# Altium PCB PCB1.PcbDoc (part 1 of 2)
Units mm, origin at the board's own origin, x right, y up, seen from the top; angles counter-clockwise.
Board outline 153 x 70 mm, 4 copper layers (Top Layer, Middle Layer 1, Middle Layer 2, Bottom Layer), stack 0.417 mm thick; 107 components, 120 nets, 560 pads, 392 vias.
Unrouted connection lines stored in the file: 47.
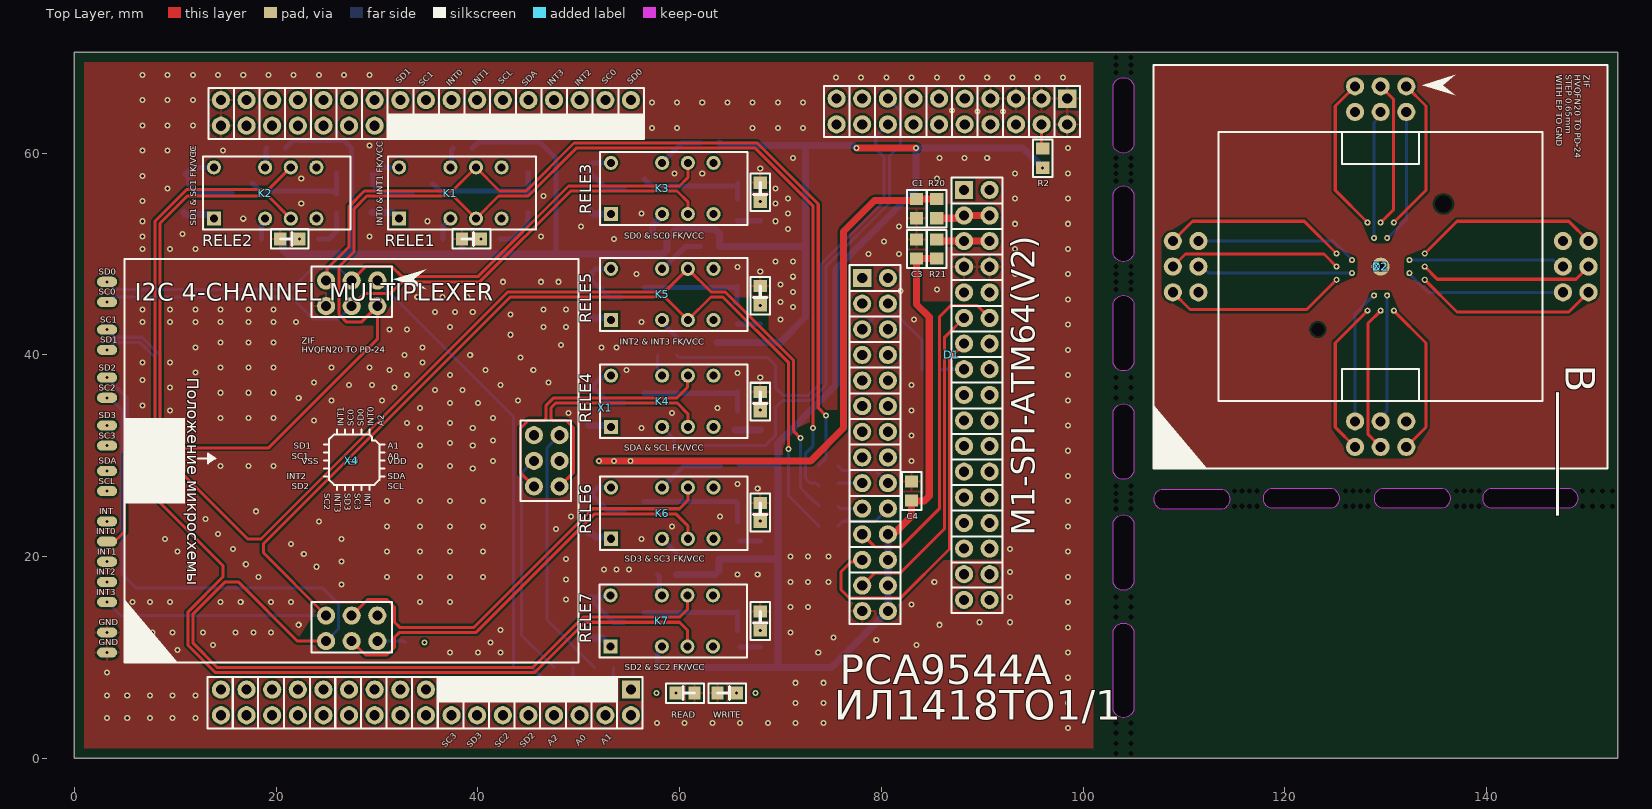
[diagram p0: Top Layer view]
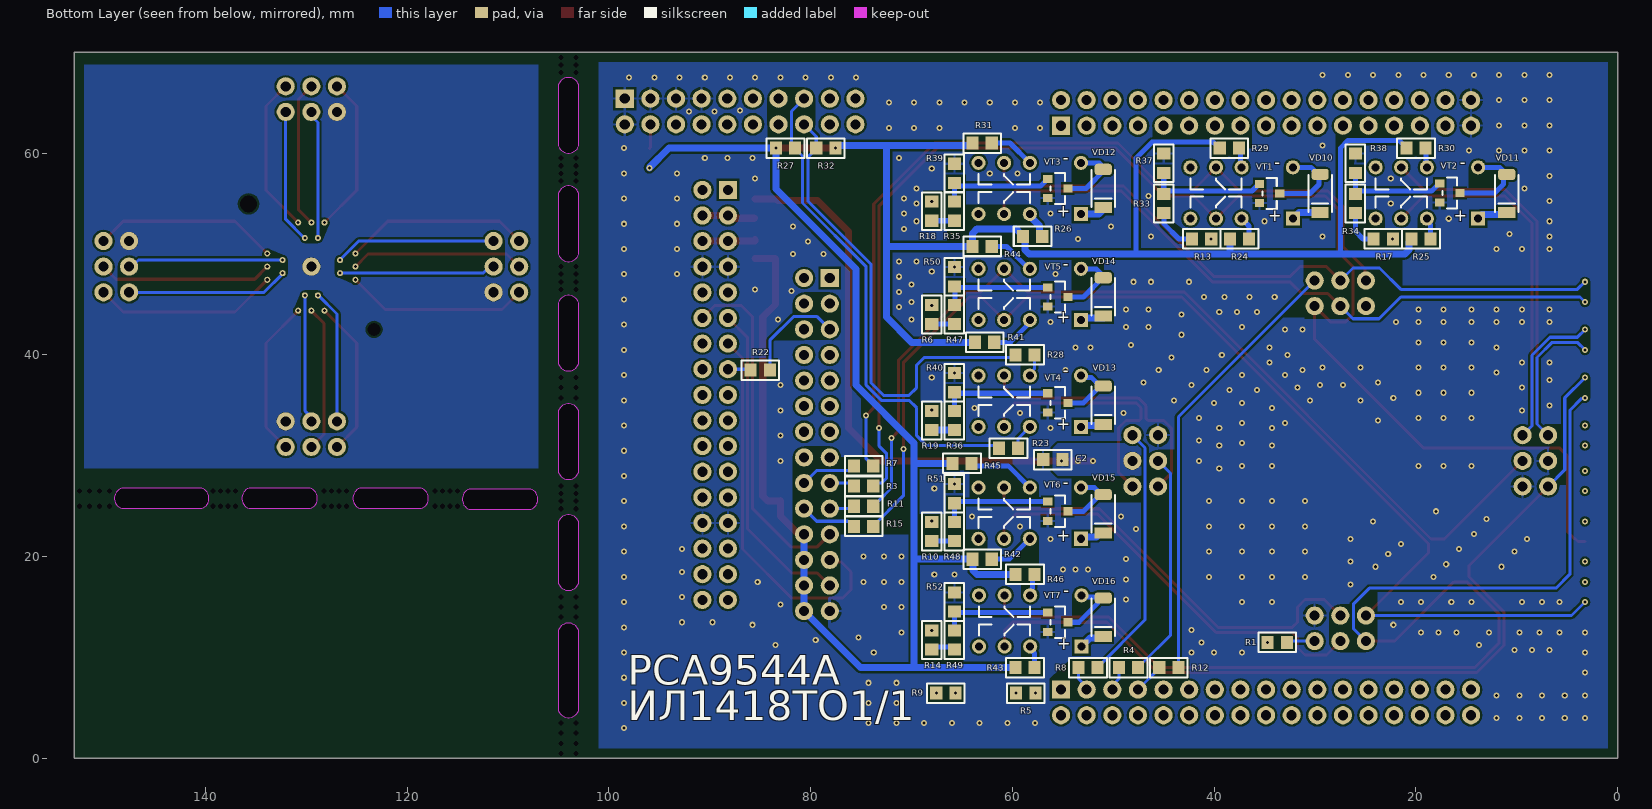
[diagram p1: Bottom Layer view, seen from below]
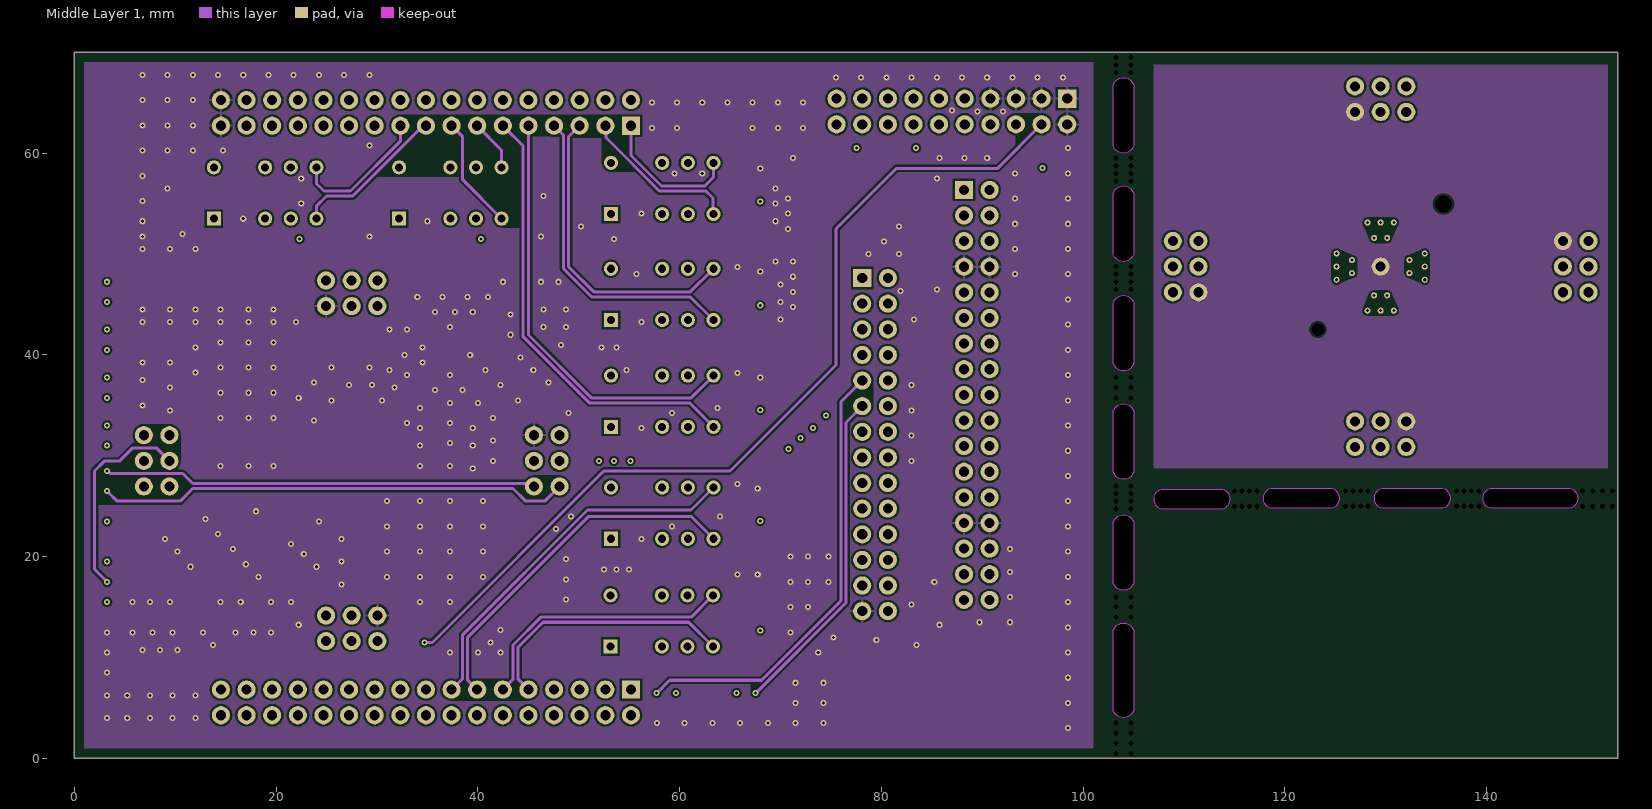
[diagram p2: Middle Layer 1]
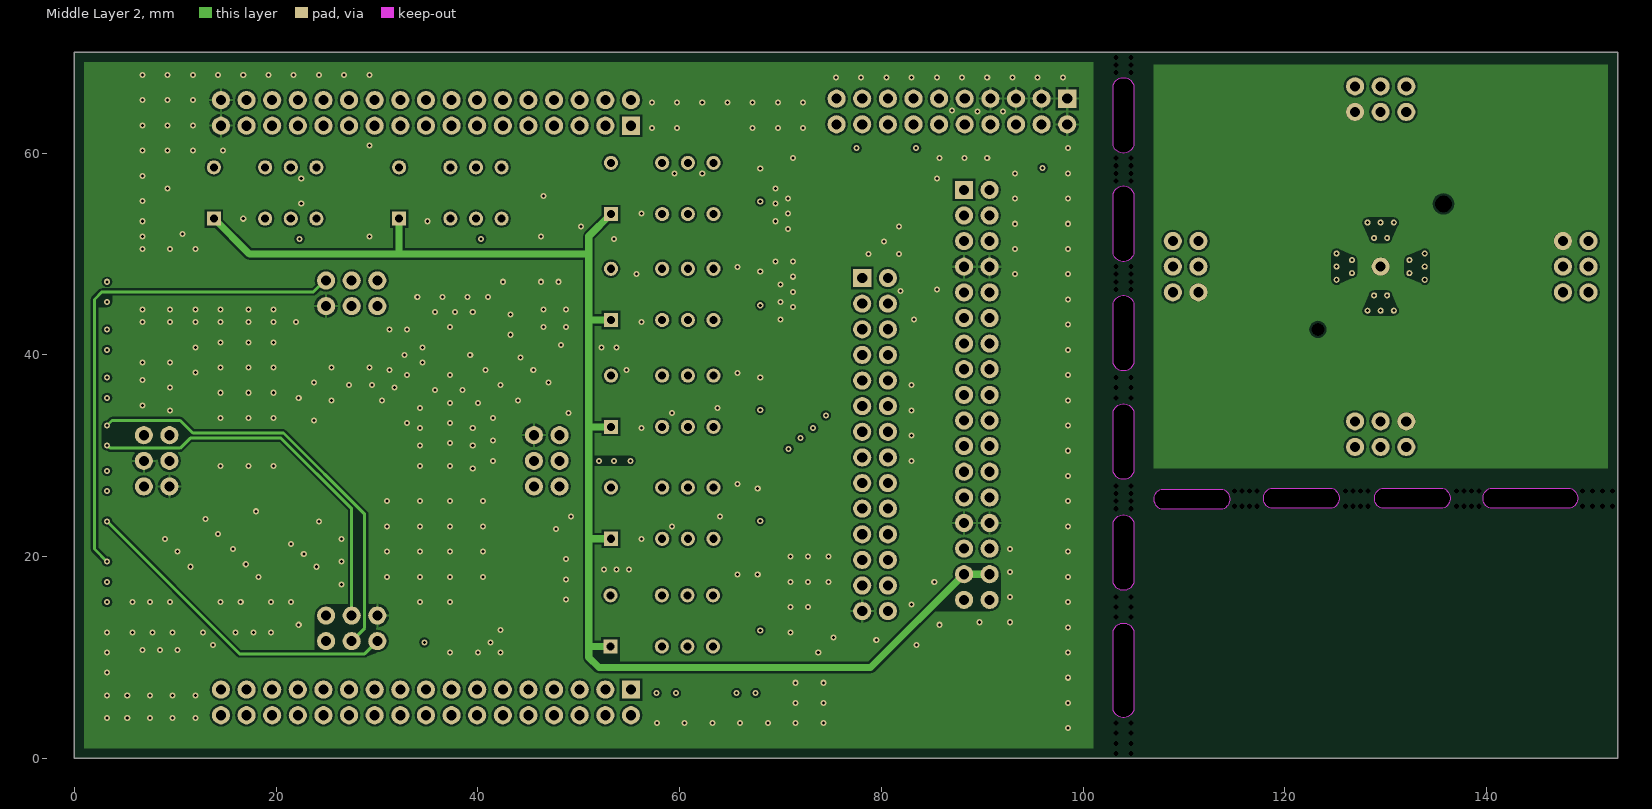
[diagram p3: Middle Layer 2]

## Layer stack, top to bottom
Top Solder: solder mask 0.025, Solder Resist, Dk 4
Top Layer: signal copper 0.018
Dielectric 1: prepreg 0.115, FR4 PR, Dk 4.2
Middle Layer 1: signal copper 0.018
Dielectric 2: prepreg 0.115, FR4 PR, Dk 4.2
Middle Layer 2: signal copper 0.018
Dielectric 3: prepreg 0.115, FR4 PR, Dk 4.2
Bottom Layer: signal copper 0.018
Bottom Solder: solder mask 0.025, Solder Resist, Dk 4

## Board outline
0,0 153,0 153,70 0,70
cut-out: 113.827,26.699 cw(c113.485,25.699) 113.827,24.699 107.757,24.699 cw(c108.099,25.699) 107.757,26.699
cut-out: 124.679,26.783 cw(c124.337,25.783) 124.679,24.783 118.609,24.783 cw(c118.951,25.783) 118.609,26.783
cut-out: 148.303,26.783 cw(c147.961,25.783) 148.303,24.783 140.359,24.783 cw(c140.701,25.783) 140.359,26.783
cut-out: 135.679,26.783 cw(c135.337,25.783) 135.679,24.783 129.609,24.783 cw(c129.951,25.783) 129.609,26.783
cut-out: 105.001,17.374 cw(c104.001,17.716) 103.001,17.374 103.001,23.445 cw(c104.001,23.103) 105.001,23.445
cut-out: 105.001,4.75 cw(c104.001,5.092) 103.001,4.75 103.001,12.695 cw(c104.001,12.353) 105.001,12.695
cut-out: 105.001,39.124 cw(c104.001,39.466) 103.001,39.124 103.001,45.195 cw(c104.001,44.853) 105.001,45.195
cut-out: 105.001,28.374 cw(c104.001,28.716) 103.001,28.374 103.001,34.445 cw(c104.001,34.103) 105.001,34.445
cut-out: 105,49.965 cw(c104,50.307) 103,49.965 103,56.035 cw(c104,55.693) 105,56.035
cut-out: 105,60.715 cw(c104,61.057) 103,60.715 103,66.785 cw(c104,66.443) 105,66.785

## Design rules (kind name [scope] priority, off if disabled: settings)
Clearance [All] p1: gap=0.2 ignorepadtopadclearanceinfootprint=FALSE except(0: Arc-Hole Track-Hole SMDPad-Hole THPad-Hole Via-Hole Fill-Hole Poly-Hole Region-Hole Text-Hole)
ComponentClearance [All] p1: gap=0 collisioncheckmode=3 verticalgap=0 showdistances=FALSE
HoleToHoleClearance [All] p1: gap=0 allowstackedmicrovias=TRUE
PolygonConnect [All vs InNet('GND')] p1: thpad.connectstyle=Relief thpad.reliefconductorwidth=0.254 thpad.reliefentries=4 thpad.polygonreliefangle="90 Angle" thpad.airgapwidth=0.254 smdpad.connectstyle=Relief smdpad.reliefconductorwidth=0.254 smdpad.reliefentries=4 smdpad.polygonreliefangle="90 Angle" smdpad.airgapwidth=0.254 via.connectstyle=Direct via.reliefconductorwidth=0.254 via.reliefentries=4 via.polygonreliefangle="90 Angle" via.airgapwidth=0.254
RoutingVias [All] p1: holewidth=0.3 width=0.6 viastyle="Through Hole" minholewidth=0.3 minwidth=0.6 maxholewidth=0.6 maxwidth=1.2
SilkToSilkClearance [All] p1: silktosilkclearance=0
SilkToSolderMaskClearance [IsPad] p1: minsilkscreentomaskgap=0 clearancetoexposedcopper=TRUE
SolderMaskExpansion [All] p1: expansion=0.102 istentingtop=FALSE
Width [All] p1: maxlimit=0.7 minlimit=0.2 preferedwidth=0.3
26 further rules are at their usual default settings.

## Components (designator, comment, footprint, x,y, rotation, side; value= is the part's Value field where it differs from the comment)
C1 "10uF" 0805 83.5,54.5 r270 top
C2 "0.1uF" 0805 56,29.625 r0 bottom
C3 "10uF" 0805 83.5,50.5 r90 top
C4 "0.1uF" 0805 83,26.5 r90 top
D1 "M1-SPI-ATM64(V2)" M1-SPI-ATM64(V2) 87,40 r270 top locked
D2 "PCA9544ABS" 20LQ65TS15050 129.5,48.75 r0 top
GND "Contact" Contact 3.25,10.5 r180 top (schematic designator KP17)
GND "Contact" Contact 3.25,12.5 r180 top (schematic designator KP16)
INT "Contact" Contact 3.25,23.5 r180 top (schematic designator KP1)
INT0 "Contact" Contact 3.25,21.5 r180 top (schematic designator KP2)
INT1 "Contact" Contact 3.25,19.5 r180 top (schematic designator KP3)
INT2 "Contact" Contact 3.25,17.5 r180 top (schematic designator KP4)
INT3 "Contact" Contact 3.25,15.5 r180 top (schematic designator KP5)
K1 "V23079A1001B301 TE" V23079A1001B301 38.5,56.05 r0 top
K2 "V23079A1001B301 TE" V23079A1001B301 20.14,56.05 r0 top
K3 "V23079A1001B301 TE" V23079A1001B301 59.5,56.5 r0 top
K4 "V23079A1001B301 TE" V23079A1001B301 59.5,35.408 r0 top
K5 "V23079A1001B301 TE" V23079A1001B301 59.5,46 r0 top
K6 "V23079A1001B301 TE" V23079A1001B301 59.5,24.315 r0 top
K7 "V23079A1001B301 TE" V23079A1001B301 59.46,13.63 r0 top
R1 "1" 0805 33.75,11.5 r0 bottom
R2 "10k" 0805 96,59.5 r270 top
R3 "1" 0805 74.75,27 r0 bottom
R4 "1" 0805 48.5,9 r0 bottom
R5 "2.2k" 0805 58.68,6.47 r0 bottom
R6 "2.2k" 0805 68,44 r90 bottom
R7 "1" 0805 74.75,29 r0 bottom
R8 "1" 0805 52.5,9 r0 bottom
R9 "2.2k" 0805 66.6,6.47 r180 bottom
R10 "2.2k" 0805 68,22.5 r90 bottom
R11 "1" 0805 74.75,25 r0 bottom
R12 "1" 0805 44.5,9 r0 bottom
R13 "2.2k" 0805 41.241,51.5 r180 bottom
R14 "2.2k" 0805 68,11.75 r90 bottom
R15 "1" 0805 74.75,23 r0 bottom
R17 "2.2k" 0805 23.241,51.5 r180 bottom
R18 "2.2k" 0805 68,54.25 r90 bottom
R19 "2.2k" 0805 68,33.5 r90 bottom
R20 "1" 0805 85.5,54.5 r90 top
R21 "1" 0805 85.5,50.5 r270 top
R22 "1" 0805 85,38.5 r0 bottom
R23 "100" 0805 60.398,30.75 r0 bottom
R24 "10k" 0805 37.5,51.5 r0 bottom
R25 "10k" 0805 19.5,51.5 r0 bottom
R26 "10k" 0805 58,51.75 r0 bottom
R27 "10k" 0805 82.5,60.5 r0 bottom
R28 "100" 0805 58.75,40 r0 bottom
R29 "10k" 0805 38.5,60.5 r0 bottom
R30 "10k" 0805 20,60.5 r0 bottom
R31 "10k" 0805 63,61 r0 bottom
R32 "10k" 0805 78.5,60.5 r180 bottom
R33 "1k" 0805 45,55 r90 bottom
R34 "1k" 0805 26,55 r90 bottom
R35 "1k" 0805 65.75,54.25 r90 bottom
R36 "1k" 0805 65.75,33.5 r90 bottom
R37 "20k" 0805 45,59 r90 bottom
R38 "20k" 0805 26,59 r90 bottom
R39 "20k" 0805 65.75,58 r90 bottom
R40 "20k" 0805 65.75,37.25 r90 bottom
R41 "10k" 0805 62.75,41.25 r0 bottom
R42 "10k" 0805 63,19.75 r0 bottom
R43 "10k" 0805 58.75,9 r0 bottom
R44 "10k" 0805 63,50.75 r0 bottom
R45 "10k" 0805 65,29.25 r0 bottom
R46 "10k" 0805 58.75,18.25 r0 bottom
R47 "1k" 0805 65.75,44 r90 bottom
R48 "1k" 0805 65.75,22.5 r90 bottom
R49 "1k" 0805 65.75,11.75 r90 bottom
R50 "20k" 0805 65.75,47.75 r90 bottom
R51 "20k" 0805 65.75,26.25 r90 bottom
R52 "20k" 0805 65.75,15.5 r90 bottom
READ "LED(0805)" 0805(LED) 60.55,6.47 r0 top (schematic designator VD1)
RELE1 "LED(0805)" 0805(LED) 39.37,51.5 r180 top (schematic designator VD5)
RELE2 "LED(0805)" 0805(LED) 21.37,51.5 r180 top (schematic designator VD7)
RELE3 "LED(0805)" 0805(LED) 68,56.12 r90 top (schematic designator VD8)
RELE4 "LED(0805)" 0805(LED) 68,35.37 r90 top (schematic designator VD9)
RELE5 "LED(0805)" 0805(LED) 68,45.87 r90 top (schematic designator VD2)
RELE6 "LED(0805)" 0805(LED) 68,24.37 r90 top (schematic designator VD4)
RELE7 "LED(0805)" 0805(LED) 68,13.62 r90 top (schematic designator VD6)
SC0 "Contact" Contact 3.25,45.25 r180 top (schematic designator KP12)
SC1 "Contact" Contact 3.25,42.5 r180 top (schematic designator KP13)
SC2 "Contact" Contact 3.25,35.75 r180 top (schematic designator KP14)
SC3 "Contact" Contact 3.25,31 r180 top (schematic designator KP15)
SCL "Contact" Contact 3.25,26.5 r0 top (schematic designator KP11)
SD0 "Contact" Contact 3.25,47.25 r180 top (schematic designator KP7)
SD1 "Contact" Contact 3.25,40.5 r180 top (schematic designator KP8)
SD2 "Contact" Contact 3.25,37.75 r180 top (schematic designator KP9)
SD3 "Contact" Contact 3.25,33 r180 top (schematic designator KP10)
SDA "Contact" Contact 3.25,28.5 r180 top (schematic designator KP6)
VD10 "LL4148 NXP" SOD80C 29.5,56 r270 bottom
VD11 "LL4148 NXP" SOD80C 11,56 r270 bottom
VD12 "LL4148 NXP" SOD80C 51,56.5 r270 bottom
VD13 "LL4148 NXP" SOD80C 51,35 r270 bottom
VD14 "LL4148 NXP" SOD80C 51,45.75 r270 bottom
VD15 "LL4148 NXP" SOD80C 51,24.25 r270 bottom
VD16 "LL4148 NXP" SOD80C 51,14 r270 bottom
VT1 "MMBT5551L" SOT-23 34.5,56 r270 bottom
VT2 "MMBT5551L" SOT-23 16.64,56.05 r270 bottom
VT3 "MMBT5551L" SOT-23 55.5,56.5 r270 bottom
VT4 "MMBT5551L" SOT-23 55.5,35.25 r270 bottom
VT5 "MMBT5551L" SOT-23 55.5,45.75 r270 bottom
VT6 "MMBT5551L" SOT-23 55.5,24.5 r270 bottom
VT7 "MMBT5551L" SOT-23 55.5,13.5 r270 bottom
WRITE "LED(0805)" 0805(LED) 64.73,6.47 r180 top (schematic designator VD3)
X1 "FORMULA" FORMULA 43,33.5 r0 top locked
X2 "HVQFN20 to DIP-7.62" "HVQFN20 to PD-24" 129.5,48.75 r0 top
X4 "HVQFN20 to DIP-7.62" "HVQFN20 to PD-24" 27.5,29.5 r0 top locked

## Footprints (in the part's own frame and the unit in brackets; to place one, negate y for a bottom-side part, rotate by r counter-clockwise, add the part's x,y. Pads: shape width x height; smd on the part's side, far side on the other; paste and mask are expansions set on the pad)
20LQ65TS15050 [mm]
  round 0 hole 1.27 unplated: 0(-6.225,-6.225)
  round 0 hole 1.68 unplated: 0(6.225,6.225)
  round 0.6 hole 0.3: 1(1.3,4.37) 2(0.65,2.845) 3(0,4.37) 4(-0.65,2.845) 5(-1.3,4.37) 6(-4.37,1.3) 7(-2.845,0.65) 8(-4.37,0) 9(-2.845,-0.65) 10(-4.37,-1.3) 11(-1.3,-4.37) 12(-0.65,-2.845) 13(0,-4.37) 14(0.65,-2.845) 15(1.3,-4.37) 16(4.37,-1.3) 17(2.845,-0.65) 18(4.37,0) 19(2.845,0.65) 20(4.37,1.3)
  round 1.8 hole 1: 21(0,0)
  silkscreen extent -16.06,-13.33 16.06,13.33
0805 [mm]
  rect 1.2x1.3 smd: 1(-0.95,0) 2(0.95,0)
  silkscreen extent -1.87,-0.97 1.87,0.97, body extent -1.05,-0.63 0.95,0.63, height 0.55
0805(LED) [mm]
  rect 1.2x1.3 smd: 1(-0.95,0) 2(0.95,0)
  silkscreen extent -1.87,-0.97 1.87,0.97, body extent -1.03,-0.41 1.03,0.5, height 0.85
Contact [mm]
  oval 2x1 smd: 1(0,0)
FORMULA [mm]
  rect 1.8x1.8 hole 1: 1(12.18,29.22) VDDF(12.18,-26.68) VEEF(45.2,22.86)
  round 1.8 hole 1: 2(9.64,29.22) 3(7.1,29.22) 4(4.56,29.22) 5(2.02,29.22) 6(-0.52,29.22) 7(-3.06,29.22) 8(-5.6,29.22) 9(-8.14,29.22) 10(-10.68,29.22) 11(-13.22,29.22) 12(-15.76,29.22) 13(-18.3,29.22) 14(-20.84,29.22) 15(-23.38,29.22) 16(-25.92,29.22) 17(12.18,31.76) 18(9.64,31.76) 19(7.1,31.76) 20(4.56,31.76) 21(2.02,31.76) 22(-0.52,31.76) 23(-3.06,31.76) 24(-5.6,31.76) 25(-8.14,31.76) 26(-10.68,31.76) 27(-13.22,31.76) 28(-15.76,31.76) 29(-18.3,31.76) 30(-20.84,31.76) 31(-23.38,31.76) 32(-25.92,31.76) 33(-28.46,-29.22) 34(-25.92,-29.22) 35(-23.38,-29.22) 36(-20.84,-29.22) 37(-18.3,-29.22) 38(-15.76,-29.22) 39(-13.22,-29.22) 40(-10.68,-29.22) 41(-8.14,-29.22) 42(-5.6,-29.22) 43(-3.06,-29.22) 44(-0.52,-29.22) 45(2.02,-29.22) 46(4.56,-29.22) 47(7.1,-29.22) 48(9.64,-29.22) 49(-28.46,-26.68) 50(-25.92,-26.68) 51(-23.38,-26.68) 52(-20.84,-26.68) 53(-18.3,-26.68) 54(-15.76,-26.68) 55(-13.22,-26.68) 56(-10.68,-26.68) 57(-8.14,-26.68) 58(-5.6,-26.68) 59(-3.06,-26.68) 60(-0.52,-26.68) 61(2.02,-26.68) 62(4.56,-26.68) 63(7.1,-26.68) 64(9.64,-26.68) +5V(45.2,-15.24) +5V(47.74,-15.24) +5V_VCCF(45.2,20.32) +5V_VCCS(47.74,20.32) +5V_VDDF(45.2,17.78) +5V_VDDS(47.74,17.78) +12V(45.2,-12.7) +12V(47.74,-12.7) -12V(45.2,-17.78) -12V(47.74,-17.78) GND(-28.46,29.22) GND(-28.46,31.76) GND(45.2,-10.16) GND(45.2,15.24) GND(47.74,-10.16) GND(47.74,15.24) IN-OUT1(47.74,10.16) IN-OUT2(47.74,7.62) IN-OUT3(47.74,5.08) IN-OUT4(47.74,2.54) IN-OUT5(47.74,0) IN-OUT6(47.74,-2.54) IN-OUT7(47.74,-5.08) IN-OUT8(47.74,-7.62) NC(45.2,12.7) NC(47.74,12.7) OUT1(45.2,10.16) OUT2(45.2,7.62) OUT3(45.2,5.08) OUT4(45.2,2.54) OUT5(45.2,0) OUT6(45.2,-2.54) OUT7(45.2,-5.08) OUT8(45.2,-7.62) VDDS(12.18,-29.22) VEES(47.74,22.86)
  silkscreen extent -29.8,-30.51 49.02,32.97, body extent -29.79,-30.4 48.98,32.92, height 3
"HVQFN20 to PD-24" [mm]
  round 1.8 hole 1: 1(2.54,17.875) 2(2.54,15.335) 3(0,17.875) 4(0,15.335) 5(-2.54,17.875) 6(-20.605,2.54) 7(-18.065,2.54) 8(-20.605,0) 9(-18.065,0) 10(-20.605,-2.54) 11(-2.54,-17.875) 12(-2.54,-15.335) 13(0,-17.875) 14(0,-15.335) 15(2.54,-17.875) 16(20.605,-2.54) 17(18.065,-2.54) 18(20.605,0) 19(18.065,0) 20(20.605,2.54) 21(-18.065,-2.54) 21(-2.54,15.335) 21(2.54,-15.335) 21(18.065,2.54)
  silkscreen extent -22.5,-20 22.5,20, body extent -22,-19 21.75,19.25, height 2.8
M1-SPI-ATM64(V2) [mm]
  rect 1.8x1.8 hole 1: 1X2(-25.4,11.43) 1X3(-7.62,-8.89)
  round 1.8 hole 1: 2X2(-22.86,11.43) 2X3(-7.62,-6.35) 3X2(-25.4,8.89) 3X3(-5.08,-8.89) 4X2(-22.86,8.89) 4X3(-5.08,-6.35) 5X2(-25.4,6.35) 5X3(-2.54,-8.89) 6X2(-22.86,6.35) 6X3(-2.54,-6.35) 7X2(-25.4,3.81) 7X3(0,-8.89) 8X2(-22.86,3.81) 8X3(0,-6.35) 9X2(-25.4,1.27) 9X3(2.54,-8.89) 10X2(-22.86,1.27) 10X3(2.54,-6.35) 11X2(-25.4,-1.27) 11X3(5.08,-8.89) 12X2(-22.86,-1.27) 12X3(5.08,-6.35) 13X2(-25.4,-3.81) 13X3(7.62,-8.89) 14X2(-22.86,-3.81) 14X3(7.62,-6.35) 15X2(-25.4,-6.35) 15X3(10.16,-8.89) 16X2(-22.86,-6.35) 16X3(10.16,-6.35) 17X2(-25.4,-8.89) 17X3(12.7,-8.89) 18X2(-22.86,-8.89) 18X3(12.7,-6.35) 19X2(-25.4,-11.43) 19X3(15.24,-8.89) 20X2(-22.86,-11.43) 20X3(15.24,-6.35) 21X3(17.78,-8.89) 22X3(17.78,-6.35) 23X3(20.32,-8.89) 24X3(20.32,-6.35) 25X3(22.86,-8.89) 26X3(22.86,-6.35) 27X3(25.4,-8.89) 28X3(25.4,-6.35)
  silkscreen extent -26.67,-12.7 26.67,12.7
SOD80C [mm]
  rrect50% 1.1x1.7 smd: 1(-1.9,0)
  rect 1.1x1.7 smd: 2(1.9,0)
  silkscreen extent -1.85,-1.17 1.85,1.17, body extent -1.9,-0.8 1.8,0.8, height 1.55
SOT-23 [mm]
  rect 0.8x0.9 smd: 1(-0.95,-1) 1(-0.95,-1) 2(0.95,-1) 2(0.95,-1) 3(0,1) 3(0,1)
  silkscreen extent -1.55,-0.72 1.55,0.7, body extent -1.5,-1.25 1.5,1.25, height 1.05
V23079A1001B301 [mm]
  rect 1.4x1.4 hole 0.8: 1(-6.3,-2.54)
  round 1.4 hole 0.8: 3(-1.22,-2.54) 4(1.32,-2.54) 5(3.86,-2.54) 8(3.86,2.54) 9(1.32,2.54) 10(-1.22,2.54) 12(-6.3,2.54)
  silkscreen extent -7.4,-3.63 7.25,3.63, body extent -7.25,-3.6 7.25,3.6, height 10.4

## Part data
C1 C2 C3 C4: library part C0805, ComponentHeigt=1.3, Firme=AVX, KIND=Конденсатор, Leadform=SMD, Packaging=0805
R1 R2 R3 R4 R5 R6 R7 R8 R9 R10 R11 R12 R13 R14 R15 R17 R18 R19 R20 R21 R22 R23 R24 R25 R26 R27 R28 R29 R30 R31 R32 R33 R34 R35 R36 R37 R38 R39 R40 R41 R42 R43 R44 R45 R46 R47 R48 R49 R50 R51 R52: library part "R0805 Yageo", ComponentHeigt=0.6, Firme=Yageo, KIND=Резистор, Leadform=SMD, Packaging=0805
D1: ComponentHeigt=5.5, Name=Вилка, Specification="Вилка PLD2-2 *", Typ=PLD2-2
READ RELE1 RELE2 RELE3 RELE4 RELE5 RELE6 RELE7 WRITE: ComponentHeigt=0.75, Firme=Kingbright, KIND="Светодиод L-1154GD Kingbright", Leadform="в отверстия", NN=24003000
VD10 VD11 VD12 VD13 VD14 VD15 VD16: Component Link=http://www.nxp.com, ComponentHeigt=1.6, Firme=NXP, KIND="Диод LL4148 NXP", Leadform=SMD, NN=24009301, Packaging=SOD-80C
VT1 VT2 VT3 VT4 VT5 VT6 VT7: ComponentHeigt=1.1, Firme=ONS, KIND="Транзистор MMBT5551L*G ONS", Leadform=SMD, NN=24007468, Packaging=SOT-23

## Free pads (board coordinates)
  round 0 hole 0.5 unplated: 38(104.75,2.5) 38(104.75,15) 38(104.75,26.25) 38(104.75,36.75) 38(104.75,48) 38(104.75,58.75) 38(104.75,68) 38(115.75,26.5) 38(126.75,26.5) 38(137.75,26.5) 38(150.5,26.5) 39(104.75,3.5) 39(104.75,16) 39(104.75,27) 39(104.75,37.75) 39(104.75,48.75) 39(104.75,59.5) 39(104.75,68.75) 39(104.75,69.5) 39(115,26.5) 39(126,26.5) 39(137,26.5) 39(149.5,26.5) 41(103.25,1.5) 41(103.25,2.5) 41(103.25,14) 41(103.25,15) 41(103.25,25.5) 41(103.25,26.25) 41(103.25,35.75) 41(103.25,36.75) 41(103.25,47.25) 41(103.25,48) 41(103.25,58) 41(103.25,58.75) 41(103.25,68) 41(115.75,25) 41(116.5,25) 41(126.75,25) 41(127.5,25) 41(137.75,25) 41(138.5,25) 41(150.5,25) 41(151.5,25) 42(103.25,3.5) 42(103.25,16) 42(103.25,27) 42(103.25,37.75) 42(103.25,48.75) 42(103.25,59.5) 42(103.25,68.75) 42(103.25,69.5) 42(115,25) 42(126,25) 42(137,25) 42(149.5,25) 43(103.25,0.5) 43(103.25,24.75) 43(103.25,46.5) 43(103.25,57.25) 43(104.75,0.5) 43(104.75,1.5) 43(104.75,14) 43(104.75,24.75) 43(104.75,25.5) 43(104.75,35.75) 43(104.75,46.5) 43(104.75,47.25) 43(104.75,57.25) 43(104.75,58) 43(116.5,26.5) 43(117.25,25) 43(117.25,26.5) 43(127.5,26.5) 43(128.25,25) 43(128.25,26.5) 43(138.5,26.5) 43(139.25,25) 43(139.25,26.5) 43(151.5,26.5) 43(152.5,25) 43(152.5,26.5)

## Via types
v1: diameter 0.6, hole 0.3, Top Layer to Bottom Layer, tented both sides, 392 vias

## Nets (pads, with @x,y where several pads share a name; then routed paths per layer and width w, separated by ;. In a path a pad name is that pad's centre, name@x,y a point inside that pad or via, vN(x,y) a via of type N, cw(c..) or ccw(c..) an arc to the next point about the centre after c; other vN are vias at no path point)
+5V_CONST: K1.1 K2.1 K3.1 K4.1 K5.1 K6.1 K7.1 VD10.2 VD11.2 VD12.2 VD13.2 VD14.2 VD15.2 VD16.2 X1.+5V | length 158.8
  Middle Layer 2 w0.7: K2.1@13.84,53.51 17.35,50 32.25,50 ; K1.1@32.2,53.51 32.2,50.05 32.25,50 ; K7.1@53.16,11.09 51.09,11.09 51,11 ; K6.1@53.2,21.775 51.025,21.775 51,21.75 ; K4.1@53.2,32.868 51.174,32.868 51,33.042 ; K5.1@53.2,43.46 51.19,43.46 51,43.65 ; K3.1@53.2,53.96 51,51.76 51,50 ; X1.+5V@90.74,18.26 X1.+5V@88.2,18.26 78.94,9 52,9 51,10 51,11 ; 32.25,50 51,50 ; 51,11 51,21.75 ; 51,21.75 51,33.042 ; 51,33.042 51,43.65 ; 51,43.65 51,50
  Bottom Layer w0.7: VD11.2@10.893,54.1 11.093,53.9 13.45,53.9 K2.1@13.84,53.51 ; VD10.2@29.5,54.1 31.61,54.1 K1.1@32.2,53.51 ; VD12.2@50.5,54.6 50.8,54.6 51.44,53.96 K3.1@53.2,53.96 ; VD14.2@50.75,43.85 50.95,43.65 52.733,43.65 K5.1@52.95,43.433 ; VD16.2@51,12.1 51.167,11.933 52.317,11.933 K7.1@53.16,11.09 ; VD15.2@51,22.35 51.3,22.35 51.68,21.97 53.005,21.97 K6.1@53.2,21.775 ; VD13.2@51,33.1 51.116,32.984 53.084,32.984 K4.1@53.2,32.868
+5V_VCC: R20.1 X1.+5V_VCCF X1.+5V_VCCS | length 5.3
  Top Layer w0.7: R20.1@85.55,53.55 87.632,53.55 87.902,53.82 X1.+5V_VCCS@90.74,53.82
+5V_VDD: R21.1 X1.+5V_VDDF X1.+5V_VDDS | length 5.4
  Top Layer w0.7: R21.1@85.5,51.45 85.5,51.28 X1.+5V_VDDF@88.2,51.28 X1.+5V_VDDS@90.74,51.28
A0_F: R4.2 X1.63 | length 2.4
  Bottom Layer w0.3: R4.2@49.45,9 49.45,7.876 50.1,7.226 X1.63@50.1,6.82
A0_KY: D2.19 X2.19 | length 15.5
  Bottom Layer w0.3: D2.19@132.345,49.4 146.639,49.4 147.289,48.75 X2.19@147.565,48.75
A0_PCA: R4.1 X4.19 | length 22.4
  Bottom Layer w0.3: X4.19@45.565,29.5 44.315,28.25 44.315,12.235 47.05,9.5 47.1,9.5 47.55,9.05 R4.1@47.55,9
A1_F: R8.2 X1.64 | length 2.5
  Bottom Layer w0.3: X1.64@52.64,6.82 52.64,7.09 53.45,7.9 R8.2@53.45,9
A1_KY: D2.20 X2.20 | length 18.4
  Top Layer w0.3: D2.20@133.87,50.05 137.07,53.25 148.145,53.25 X2.20@150.105,51.29
A1_PCA: R8.1 X4.20 | length 25.5
  Bottom Layer w0.3: X4.20@48.105,32.04 46.855,30.79 46.855,13.745 51.55,9.05 R8.1@51.55,9
A2_F: R12.2 X1.62 | length 3.1
  Bottom Layer w0.3: R12.2@45.45,9 45.45,8.95 47.56,6.84 X1.62@47.56,6.82
A2_KY: D2.1 X2.1 | length 15.6
  Top Layer w0.3: D2.1@130.8,53.12 134,56.32 134,64.665 X2.1@132.04,66.625
A2_PCA: R12.1 X4.1 | length 44
  Bottom Layer w0.3: X4.1@30.04,47.375 43.55,33.865 R12.1@43.55,9
DI1_MC: D1.21X3 X1.IN-OUT1 | length 34.7
  Top Layer w0.3: D1.21X3@78.11,22.22 79.36,20.97 81.97,20.97 85.75,24.75 85.75,43.75 86.91,44.91 89.49,44.91 X1.IN-OUT1@90.74,43.66
DO1_MC: D1.25X3 X1.OUT1 | length 32.2
  Top Layer w0.3: D1.25X3@78.11,17.14 79.36,18.39 81.89,18.39 86.25,22.75 86.25,41.71 X1.OUT1@88.2,43.66
DO2_MC: D1.23X3 X1.OUT2 | length 38.5
  Top Layer w0.3: D1.23X3@78.11,19.68 77.92,19.49 76.99,19.49 76,18.5 76,16.73 76.84,15.89 81.89,15.89 86.75,20.75 86.75,39.67 X1.OUT2@88.2,41.12
EP_KY: D2.21 X2.21
GND: C1.2 C2.2 C3.2 C4.2 D1.1X2 D1.2X2 D1.3X2 D1.5X2 D1.7X2 D1.27X3 GND.1 R37.2 R38.2 R39.2 R40.2 R50.2 R51.2 R52.2 READ.2 RELE1.2 RELE2.2 RELE3.2 RELE4.2 RELE5.2 RELE6.2 RELE7.2 VT1.2 VT2.2 VT3.2 VT4.2 VT5.2 VT6.2 VT7.2 WRITE.2 X1.GND X4.8 X4.21
  other v1: 98.5,3 57.75,3.5 60.5,3.5 63.25,3.5 66,3.5 68.75,3.5 71.5,3.5 74.25,3.5 3.25,4 5.25,4 7.5,4 9.75,4 12,4 71.5,5.5 74.25,5.5 98.5,5.5 3.25,6.25 5.25,6.25 7.5,6.25 9.75,6.25 12,6.25 71.5,7.5 74.25,7.5 98.5,8 3.25,8.5 3.25,10.5 37.25,10.5 40,10.5 42.25,10.5 73.75,10.5 98.5,10.5 6.75,10.75 8.5,10.75 10.25,10.75 13.75,11.25 83.5,11.25 41.25,11.5 79.5,11.75 75.25,12 3.25,12.5 5.75,12.5 7.75,12.5 9.75,12.5 12.75,12.5 16,12.5 17.75,12.5 19.5,12.5 71,12.5 42.25,12.75 98.5,13 22.25,13.25 85.75,13.25 89.75,13.5 92.75,13.5 71,15 72.75,15 83,15.25 5.75,15.5 7.5,15.5 9.5,15.5 14.5,15.5 16.5,15.5 19.5,15.5 21.5,15.5 34.25,15.5 37.25,15.5 98.5,15.5 48.75,15.75 92.75,16 26.5,17.25 71,17.5 72.75,17.5 74.75,17.5 85.25,17.5 48.75,17.75 18.25,18 31,18 34.25,18 37.25,18 40.5,18 98.5,18 65.75,18.25 67.75,18.25 92.75,18.5 52.5,18.75 53.75,18.75 55,18.75 11.5,19 24,19 17,19.25 26.5,19.5 48.75,19.75 71,20 72.75,20 74.75,20 22.75,20.25 10.25,20.5 31,20.5 34.25,20.5 37.25,20.5 40.5,20.5 98.5,20.5 15.75,20.75 92.75,20.75 21.5,21.25 9,21.75 26.5,21.75 56.25,21.75 14.25,22.25 47.75,22.75 31,23 34.25,23 37.25,23 40.5,23 59.25,23 98.5,23 24.25,23.5 13,23.75 49.25,24 64,24 18,24.5 31,25.5 34.25,25.5 37.25,25.5 40.5,25.5 98.5,25.5 67.75,26.75 65.75,27.2 98.5,28 39.5,28.75 14.5,29 17.25,29 19.75,29 34.25,29 37.25,29 41.5,29.5 83,29.5 98.5,30.5 34.25,31 39.5,31 37.25,31.25 41.5,31.5 83,32 34.25,32.75 39.5,32.75 56.25,32.75 98.5,33 33,33.25 37.25,33.25 23.75,33.5 14.5,33.75 17.25,33.75 19.75,33.75 41.5,33.75 49,34.25 59.25,34.25 9.5,34.5 83,34.5 34.25,34.75 63.75,34.75 6.75,35 37.25,35.25 40,35.25 25.5,35.5 30.5,35.5 44,35.5 98.5,35.5 22.25,35.75 14.5,36.25 17.25,36.25 19.75,36.25 35.75,36.5 38.5,36.5 9.5,36.75 31.75,36.75 27.25,37 29.5,37 42.25,37 83,37 23.75,37.25 47,37.25 6.75,37.5 68,37.75 33,38 37.25,38 98.5,38 65.75,38.2 12,38.25 31.25,38.5 40.75,38.5 45.5,38.5 54.75,38.5 14.5,38.75 17.25,38.75 19.75,38.75 25.5,38.75 29.25,38.75 6.75,39.25 9.5,39.25 34.5,39.25 44.25,39.75 32.75,40 39.25,40 98.5,40.5 12,40.75 34.5,40.75 52.25,40.75 53.75,40.75 48.25,41 14.5,41.25 17.25,41.25 19.75,41.25 43.25,42 31.25,42.5 33,42.5 37.25,42.75 46.5,42.75 48.75,42.75 98.5,43 6.75,43.25 9.5,43.25 12,43.25 14.5,43.25 17.25,43.25 19.75,43.25 22,43.25 56.25,43.25 70,43.5 83.25,43.5 43.25,44 35.75,44.25 37.75,44.25 39.5,44.25 6.75,44.5 9.5,44.5 12,44.5 14.5,44.5 17.25,44.5 19.75,44.5 46.5,44.5 48.75,44.5 71.25,44.75 70,45.25 98.5,45.5 34,45.75 36.5,45.75 39,45.75 41,45.75 71.25,46.25 81.92,46.35 85.5,46.5 70,47 42.5,47.25 46.25,47.25 48,47.25 71.25,47.75 55.75,48 93.25,48 98.5,48 68,48.25 65.75,48.7 69.5,49.25 71.25,49.25 78.75,50 81.75,50 6.75,50.5 9.5,50.5 12,50.5 93.25,50.5 98.5,50.5 80.25,51.25 53.5,51.5 6.75,51.75 29.25,51.75 46.25,51.75 10.75,52 70.75,52.5 50.25,52.75 81.75,52.75 93.25,53 98.5,53 6.75,53.25 35,53.25 69.5,53.25 16.75,53.5 56.25,54 70.75,54 22.5,55 69.5,55 6.75,55.25 70.75,55.5 93.25,55.5 98.5,55.5 46.5,55.75 9.25,56.5 69.5,56.5 22.5,57.5 85.5,57.5 6.75,57.75 59.5,58 62.25,58 93.25,58 98.5,58 68,58.5 71.25,59.5 85.75,59.5 88.25,59.5 90.5,59.5 6.75,60.25 9.25,60.25 11.75,60.25 14.75,60.25 98.5,60.5 29.25,60.75 57.25,62.5 59.75,62.5 67.25,62.5 69.75,62.5 72.25,62.5 6.75,62.75 9.25,62.75 11.75,62.75 89.54,64.13 92.08,64.13 86.999,64.233 57.25,65 59.75,65 62.25,65 64.75,65 67.25,65 69.75,65 72.25,65 6.75,65.25 9.25,65.25 11.75,65.25 75.5,67.5 78,67.5 80.5,67.5 83,67.5 85.5,67.5 88,67.5 88,67.5 90.5,67.5 93,67.5 95.5,67.5 98,67.5 6.75,67.75 9.25,67.75 11.75,67.75 14.25,67.75 16.75,67.75 19.25,67.75 21.75,67.75 24.25,67.75 26.75,67.75 29.25,67.75
GND_KY: D2.8 X2.8 | length 17.3
  Top Layer w0.3: X2.8@108.895,48.75 110.145,50 123.88,50 D2.8@125.13,48.75
INT0_F: K1.5 X1.8 | length 11.3
  Middle Layer 1 w0.3: X1.8@37.4,62.72 38.5,61.62 38.5,57.37 K1.5@42.36,53.51
INT0_KY: D2.2 X2.2 | length 13.3
  Bottom Layer w0.3: D2.2@130.15,51.595 130.194,51.595 132.04,53.441 X2.2@132.04,64.085
INT0_MC: D1.17X3 R3.2 | length 2.4
  Bottom Layer w0.3: R3.2@75.7,27.25 75.75,27.3 D1.17X3@78.11,27.3
INT0_PCA: INT0.1 K1.4 R3.1 X4.2 | length 139.8
  Top Layer w0.3: INT0.1@3.25,21.5 3.939,21.5 4.182,21.743 4.251,21.743 5,22.492 5,30 5.79,30.79 19.29,30.79 30.04,41.54 X4.2@30.04,44.835 28.455,43.25 27,43.25 26.25,44 26.25,48.75 27.75,50.25 27.75,54.5 29,55.75 37.58,55.75 K1.4@39.82,53.51 42.06,55.75 45,55.75 49.75,60.5 67.5,60.5 73.25,54.75 v1(73.25,32.75)
  Bottom Layer w0.3: v1(73.25,32.75) 73.25,31.005 72.5,30.255 72.5,27.75 72.926,27.324 73.476,27.324 R3.1@73.8,27
INT1_F: K1.8 X1.7 | length 5.1
  Middle Layer 1 w0.3: X1.7@39.94,62.72 42.36,60.3 K1.8@42.36,58.59
INT1_KY: D2.5 X2.5 | length 15.6
  Top Layer w0.3: X2.5@126.96,66.625 125,64.665 125,56.32 D2.5@128.2,53.12
INT1_MC: D1.18X3 R7.2 | length 5.7
  Bottom Layer w0.3: R7.2@75.7,29 76.15,28.55 79.4,28.55 D1.18X3@80.65,27.3
INT1_PCA: INT1.1 K1.9 R7.1 X4.5 | length 138.7
  Top Layer w0.3: X4.5@24.96,47.375 25.049,47.464 25.049,48.549 27.25,50.75 27.25,54.75 28.75,56.25 37.48,56.25 K1.9@39.82,58.59 42.16,56.25 44.793,56.25 49.543,61 67.707,61 73.75,54.957 73.75,34.75 v1(74.5,34)
  Middle Layer 2 w0.3: v1(3.25,19.5) 2,20.75 2,45.5 2.75,46.25 23.724,46.25 24.849,47.375 X4.5@24.96,47.375
  Bottom Layer w0.3: R7.1@73.8,29 73.8,29.05 74.25,29.5 74.3,29.5 74.5,29.7 v1(74.5,34)
INT2_F: K5.8 X1.3 | length 30.8
  Middle Layer 1 w0.3: X1.3@50.1,62.72 49,61.62 49,48.75 51.5,46.25 61.07,46.25 K5.8@63.36,48.54
INT2_KY: D2.9 X2.9 | length 15.5
  Bottom Layer w0.3: X2.9@111.435,48.75 111.841,48.75 112.491,48.1 D2.9@126.655,48.1
INT2_MC: D1.19X3 R11.2 | length 2.5
  Bottom Layer w0.3: R11.2@75.7,25 75.94,24.76 D1.19X3@78.11,24.76
INT2_PCA: INT2.1 K5.9 R11.1 X4.9 | length 115.9
  Top Layer w0.3: X4.9@9.435,29.5 17.185,21.75 18.5,21.75 43,46.25 58.53,46.25 K5.9@60.82,48.54 63.11,46.25 64.5,46.25 71.313,39.437 71.313,32.437 v1(72,31.75)
  Middle Layer 1 w0.3: v1(3.25,17.5) 2,18.75 2,28.5 2.96,29.46 4.46,29.46 5.75,30.75 8.185,30.75 X4.9@9.435,29.5
  Bottom Layer w0.3: v1(72,31.75) 72,26.8 73.3,25.5 73.35,25.5 73.8,25.05 R11.1@73.8,25
INT3_F: K5.5 X1.4 | length 31.5
  Middle Layer 1 w0.3: X1.4@47.56,62.72 48.5,61.78 48.5,48.543 51.293,45.75 61.07,45.75 K5.5@63.36,43.46
INT3_KY: D2.12 X2.12 | length 13.3
  Bottom Layer w0.3: X2.12@126.96,33.415 126.96,44.059 128.806,45.905 D2.12@128.85,45.905
INT3_MC: D1.20X3 R15.2 | length 5.7
  Bottom Layer w0.3: R15.2@75.7,23 75.7,23.05 76.15,23.5 76.316,23.5 76.326,23.51 79.4,23.51 D1.20X3@80.65,24.76
INT3_PCA: INT3.1 K5.4 R15.1 X4.12 | length 116.2
  Top Layer w0.3: X4.12@24.96,14.165 18.75,20.375 18.75,21.293 43.207,45.75 58.53,45.75 K5.4@60.82,43.46 63.11,45.75 64.293,45.75 70.813,39.23 v1(70.813,30.687)
  Bottom Layer w0.3: v1(3.25,15.5) 4.585,14.165 X4.12@24.96,14.165 ; v1(70.813,30.687) 70.813,26.037 73.8,23.05 R15.1@73.8,23
INT_KY: D2.15 X2.15 | length 15.6
  Top Layer w0.3: D2.15@130.8,44.38 134,41.18 134,32.835 X2.15@132.04,30.875
INT_MC: D1.4X2 R1.2 R2.1 | length 92.8
  Top Layer w0.3: D1.4X2@95.89,62.86 95.89,60.56 R2.1@96,60.45
  Middle Layer 1 w0.3: v1(34.7,11.5) 35.5,11.5 52.5,28.5 65,28.5 75.5,39 75.5,52.5 81.5,58.5 91.53,58.5 D1.4X2@95.89,62.86
INT_PCA: INT.1 R1.1 X4.15 | length 35.6
  Middle Layer 2 w0.3: v1(3.25,23.5) 16.375,10.375 28.79,10.375 X4.15@30.04,11.625
  Bottom Layer w0.3: X4.15@30.04,11.625 32.675,11.625 R1.1@32.8,11.5
NetK1_3: K1.3 R24.1 | length 2.3
  Bottom Layer w0.5: R24.1@36.55,51.5 36.55,52.78 K1.3@37.28,53.51
NetK1_10: K1.10 R29.1 | length 2
  Bottom Layer w0.5: K1.10@37.28,58.59 37.415,58.725 37.415,60.365 R29.1@37.55,60.5
NetK1_12: K1.12 VD10.1 VT1.3 | length 8.3
  Bottom Layer w0.5: K1.12@32.2,58.59 30.393,58.59 30.085,58.282 30.085,58.198 29.786,57.9 VD10.1@29.5,57.9 29.607,57.793 29.607,56.893 30.5,56 VT1.3@33.5,56
NetK2_3: K2.3 R25.1 | length 2.2
  Bottom Layer w0.5: R25.1@18.55,51.5 18.55,52.896 18.92,53.266 K2.3@18.92,53.51
NetK2_10: K2.10 R30.1 | length 2
  Bottom Layer w0.5: K2.10@18.92,58.59 18.985,58.655 18.985,60.435 R30.1@19.05,60.5
NetK2_12: K2.12 VD11.1 VT2.3 | length 8.9
  Bottom Layer w0.5: K2.12@13.84,58.59 11.69,58.59 11.4,58.3 11.229,58.129 VD11.1@11,57.9 11.027,57.9 11.325,57.602 11.325,56.925 12.2,56.05 VT2.3@15.64,56.05
NetK3_3: K3.3 R26.1 | length 2.7
  Bottom Layer w0.7: R26.1@57.05,51.75 57.3,52 57.3,52.791 58.28,53.771 K3.3@58.28,53.96
NetK3_10: K3.10 R31.1 | length 4.6
  Bottom Layer w0.5: K3.10@58.28,59.04 60.24,61 R31.1@62.05,61
NetK3_12: K3.12 VD12.1 VT3.3 | length 7.5
  Bottom Layer w0.5: VD12.1@50.5,58.4 VD12.1@50.786,58.4 ; K3.12@53.2,59.04 51.393,59.04 51.085,58.732 51.085,58.698 VD12.1@50.786,58.4 ; VT3.3@54.5,56.5 52.7,56.5 50.8,58.4 VD12.1@50.786,58.4
NetK4_3: K4.3 R23.1 | length 2.6
  Bottom Layer w0.3: K4.3@58.28,32.868 59.448,31.7 R23.1@59.448,30.75
NetK4_10: K4.10 R28.1 | length 2.3
  Bottom Layer w0.3: R28.1@57.8,40 57.8,38.656 58.28,38.176 K4.10@58.28,37.948
NetK4_12: K4.12 VD13.1 VT4.3 | length 6.5
  Bottom Layer w0.5: VD13.1@51,36.9 VD13.1@51.3,36.9 ; K4.12@53.2,37.948 53.028,37.775 52.189,37.775 51.314,36.9 VD13.1@51.3,36.9 ; VT4.3@54.5,35.25 52.95,35.25 VD13.1@51.3,36.9
NetK5_3: K5.3 R41.1 | length 5
  Bottom Layer w0.5: K5.3@58.03,43.433 60.213,41.25 61.45,41.25 61.665,41.465 61.665,41.635 R41.1@61.8,41.5
NetK5_10: K5.10 R44.1 | length 4.7
  Bottom Layer w0.5: K5.10@58.28,48.54 58.376,48.54 60.586,50.75 R44.1@62.05,50.75
NetK5_12: K5.12 VD14.1 VT5.3 | length 6.7
  Bottom Layer w0.5: VD14.1@50.75,47.65 VD14.1@51.036,47.65 ; K5.12@52.95,48.513 51.685,48.513 51.335,48.162 51.335,47.948 VD14.1@51.036,47.65 ; VT5.3@54.25,45.75 52.95,45.75 51.05,47.65 VD14.1@51.036,47.65
NetK6_3: K6.3 R42.1 | length 4.6
  Bottom Layer w0.5: K6.3@58.28,21.775 60.305,19.75 R42.1@62.05,19.75
NetK6_10: K6.10 R45.1 | length 6.7
  Bottom Layer w0.5: K6.10@58.28,26.855 60.425,29 R45.1@64.05,29
NetK6_12: K6.12 VD15.1 VT6.3 | length 6.5
  Bottom Layer w0.5: VD15.1@51,26.15 51.3,26.15 52.95,24.5 VT6.3@54.5,24.5 ; VD15.1@51.15,26.3 51.436,26.3 51.585,26.448 51.585,26.547 51.893,26.855 K6.12@53.2,26.855
NetK7_3: K7.3 R43.1 | length 2.3
  Bottom Layer w0.5: R43.1@57.8,9 57.8,10.406 58.24,10.846 K7.3@58.24,11.09
NetK7_10: K7.10 R46.1 | length 2.3
  Bottom Layer w0.5: R46.1@57.8,18.25 58.02,18.03 58.02,16.913 58.068,16.865 58.068,16.342 K7.10@58.24,16.17
NetK7_12: K7.12 VD16.1 VT7.3 | length 6.8
  Bottom Layer w0.5: VD16.1@51,15.9 51.286,15.9 51.585,15.602 51.585,15.342 53.427,13.5 VT7.3@54.5,13.5 ; VD16.1@51.098,15.998 52.988,15.998 K7.12@53.16,16.17
NetR5_2: R5.2 READ.1
  other v1: 59.63,6.47
NetR6_2: R6.2 RELE5.1
  other v1: 68,44.92
NetR9_2: R9.2 WRITE.1
  other v1: 65.65,6.47
NetR10_2: R10.2 RELE6.1
  other v1: 68,23.55
NetR13_2: R13.2 RELE1.1
  other v1: 40.32,51.5
NetR14_2: R14.2 RELE7.1
  other v1: 68,12.7
NetR17_2: R17.2 RELE2.1
  other v1: 22.32,51.5
NetR18_2: R18.2 RELE3.1
  other v1: 68,55.2
NetR19_2: R19.2 RELE4.1
  other v1: 68,34.55
NetR33_2: R33.2 R37.1 VT1.1 | length 12
  Bottom Layer w0.5: VT1.1@35.5,56.95 35.55,56.95 36.25,56.25 44.7,56.25 R33.2@45,55.95 R37.1@45,58.05
NetR34_2: R34.2 R38.1 VT2.1 | length 10.9
  Bottom Layer w0.5: VT2.1@17.64,57 17.69,57 18.44,56.25 25.7,56.25 R34.2@26,55.95 R38.1@26,58.05
NetR35_2: R35.2 R39.1 VT3.1 | length 10.7
  Bottom Layer w0.5: VT3.1@56.5,57.45 56.55,57.45 56.7,57.3 56.7,57.25 57.2,56.75 R39.1@65.319,56.75 ; R35.2@65.75,55.45 R39.1@65.75,57.05
NetR36_2: R36.2 R40.1 VT4.1 | length 11.1
  Bottom Layer w0.5: VT4.1@56.5,36.2 65.65,36.2 R40.1@65.75,36.3 R36.2@65.75,34.45
NetR47_2: R47.2 R50.1 VT5.1 | length 11.2
  Bottom Layer w0.5: VT5.1@56.5,46.7 65.65,46.7 R50.1@65.7,46.75 ; R47.2@65.5,45.2 R47.2@65.7,45.4 ; R47.2@65.7,45.15 R47.2@65.7,45.4 ; R50.1@65.75,46.8 R50.1@65.7,46.75 ; R47.2@65.7,45.4 R50.1@65.7,46.75
NetR48_2: R48.2 R51.1 VT6.1 | length 11.2
  Bottom Layer w0.5: VT6.1@56.5,25.45 65.6,25.45 R51.1@65.75,25.3 R48.2@65.75,23.45
NetR49_2: R49.2 R52.1 VT7.1 | length 11.1
  Bottom Layer w0.5: VT7.1@56.5,14.45 65.65,14.45 R52.1@65.75,14.55 R49.2@65.75,12.7
READ: D1.9X3 R5.1 | length 44.8
  Middle Layer 1 w0.3: v1(57.73,6.47) 59.01,7.75 68.123,7.75 76,15.627 76,35.35 D1.9X3@78.11,37.46
RELE1: R13.1 R33.1 | length 4.5
  Bottom Layer w0.5: R13.1@42.191,51.5 43.5,51.5 44.993,52.993 44.993,54.043 R33.1@45,54.05
RELE2: R17.1 R34.1 | length 3.9
  Bottom Layer w0.5: R17.1@24.191,51.5 25.25,51.5 26,52.25 R34.1@26,54.05
RELE3: R18.1 R35.1 | length 2.3
  Bottom Layer w0.5: R35.1@65.75,53.3 R18.1@68,53.3 R18.1@68.025,53.275
RELE4: R19.1 R36.1 | length 2.5
  Bottom Layer w0.7: R36.1@65.5,32.55 R19.1@68,32.55
RELE5: R6.1 R47.1 | length 2.3
  Bottom Layer w0.5: R47.1@65.75,43.05 R6.1@68,43.05
RELE6: R10.1 R48.1 | length 2
  Bottom Layer w0.5: R48.1@66,21.55 R10.1@68,21.55
RELE7: R14.1 R49.1 | length 2
  Bottom Layer w0.5: R49.1@66,11.05 R14.1@68,11.05
RST_IN: R22.2 X1.OUT3 | length 2.3
  Bottom Layer w0.3: R22.2@85.95,38.5 86.03,38.58 X1.OUT3@88.2,38.58
RST_MC: D1.5X3 R22.1 | length 10.4
  Bottom Layer w0.3: D1.5X3@78.11,42.54 79.36,43.79 81.71,43.79 84.05,41.45 R22.1@84.05,38.5
SC0_F: K3.5 X1.2 | length 15.9
  Middle Layer 1 w0.3: X1.2@52.64,62.72 52.704,62.656 52.704,61.546 58,56.25 62.61,56.25 63.316,55.544 63.316,54.004 K3.5@63.36,53.96
SC0_KY: D2.4 X2.4 | length 12.8
  Bottom Layer w0.3: D2.4@128.85,51.595 128.85,63.029 129.5,63.679 X2.4@129.5,64.085
SC0_PCA: K3.4 SC0.1 X4.4 | length 65.6
  Top Layer w0.3: X4.4@27.5,44.835 28.75,46.085 31.335,46.085 32.5,47.25 40,47.25 40.207,47.25 49.207,56.25 59.75,56.25 60.82,55.18 K3.4@60.82,53.96
  Bottom Layer w0.3: v1(3.25,45.25) 3.75,45.75 21.5,45.75 23.665,43.585 26.25,43.585 X4.4@27.5,44.835
SC1_F: K2.5 X1.9 | length 15.4
  Middle Layer 1 w0.3: K2.5@24,53.51 24,54.75 25,55.75 27.595,55.75 34.565,62.72 X1.9@34.86,62.72
SC1_KY: D2.7 X2.7 | length 16
  Bottom Layer w0.3: X2.7@111.435,51.29 124.809,51.29 126.655,49.444 D2.7@126.655,49.4
SC1_PCA: K2.4 SC1.1 X4.7 | length 51
  Top Layer w0.3: X4.7@9.435,32.04 8.5,32.975 8.5,53.043 11.207,55.75 19.22,55.75 K2.4@21.46,53.51
  Bottom Layer w0.3: v1(3.25,42.5) 4,41.75 6.707,41.75 8.5,39.957 8.5,32.975 X4.7@9.435,32.04